# Altium PCB DA13_FPGA_edition.PcbDoc (part 3 of 3)
Units mm, origin at the board's own origin, x right, y up, seen from the top; angles counter-clockwise.
Board outline 118.01 x 92.01 mm, 2 copper layers (Top Layer, Bottom Layer); 473 components, 250 nets, 1417 pads, 16 vias.
Unrouted connection lines stored in the file: 993.
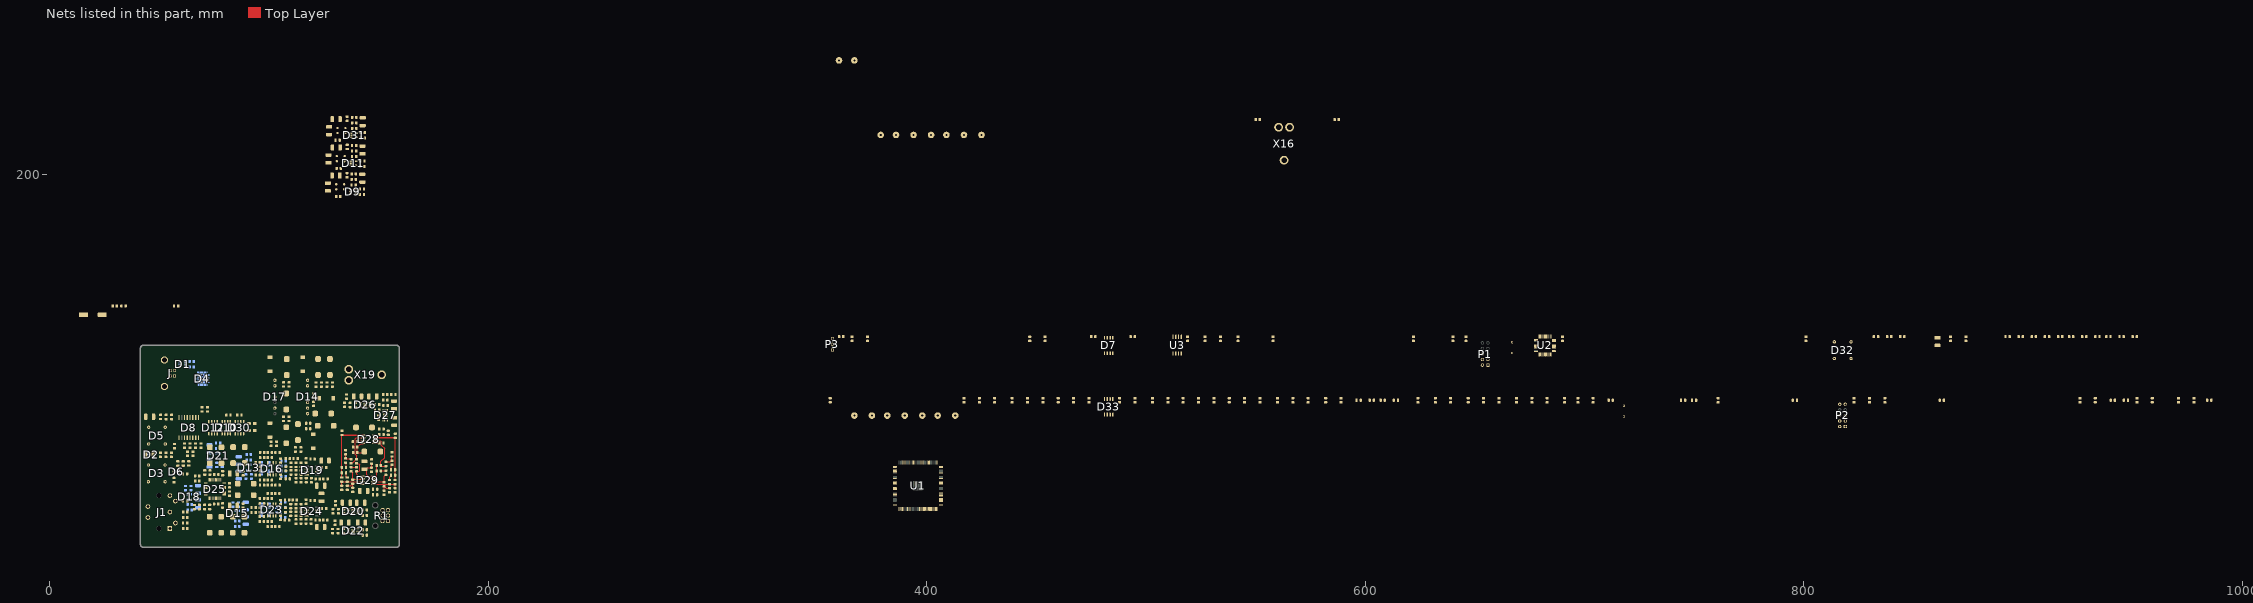
[diagram p2: the nets of this part, all layers, seen from the top]

## Via types
v1: diameter 0.66, hole 0.33, Top Layer to Bottom Layer, tented top, 16 vias

## Nets (pads, with @x,y where several pads share a name; then routed paths per layer and width w, separated by ;. In a path a pad name is that pad's centre, name@x,y a point inside that pad or via, vN(x,y) a via of type N, cw(c..) or ccw(c..) an arc to the next point about the centre after c; other vN are vias at no path point) (continued)
FPGA_nCONFIG: U1.14 U2.42
FPGA_nSTATUS: U1.9 U2.43
FPGA_SPI_CSN: D30.3 U1.76 U2.31
FPGA_SPI_MISO: P2.3 U1.20 U2.16
FPGA_SPI_MOSI: R22.2 R23.1 U2.17
FPGA_SPI_NSS: P2.5 R137.1 U1.18 U2.14
FPGA_SPI_SCK: R86.1 R87.1 U2.15
GND: C2.2 C5.2 C6.2 C7.2 C9.2 C10.2 C11.2 C14.2 C15.2 C29.2 C30.2 C45.2 C46.2 C47.2 C48.2 C49.2 C50.1 C51.2 C52.2 C53.1 C54.2 C55.2 C56.2 C58.2 C61.2 C62.2 C63.1 C64.1 C65.1 C66.1 C67.1 C69.1 C70.2 C73.2 C74.2 C75.2 C76.2 C77.2 C78.2 C80.2 C81.2 C82.2 C83.2 C84.2 C85.1 C90.2 C92.2 C93.2 C94.2 C95.2 C96.2 C97.2 C99.2 C100.2 C101.1 C102.2 C103.1 C104.2 C105.2 C106.2 C107.2 C108.2 C109.2 C110.2 C111.2 C112.2 C114.2 C115.1 C116.1 C117.2 C118.1 C119.1 C120.2 C121.2 C122.2 C124.2 C125.1 C129.1 C132.2 C133.2 C134.1 C135.2 C136.2 C137.1 C138.2 C139.2 C140.1 C141.2 C142.2 C143.1 C144.1 C145.1 C146.2 C147.2 C148.2 C149.1 C150.2 C151.2 C152.2 C153.2 C154.2 C156.2 C157.2 C158.2 C159.2 C160.2 C162.2 C163.1 C164.1 C165.2 C166.2 C170.2 C171.2 C172.1 C173.2 C174.2 C175.2 C176.2 C177.2 C178.1 C182.2 C183.1 C184.2 C185.2 C186.2 D2.3 D3.2 D5.2 D6.3 D8.9 D8.15 D10.5 D12.5 D13.2 D14.6 D15.2 D16.2 D17.4 D18.2 D20.4 D20.9 D21.2 D22.4 D22.9 D23.2 D25.13 D25.17 D25.21 D25.22 D25.29 D25.30 D25.31 D25.32 D25.39 D25.40 D25.45 D25.47 D26.4 D26.9 D27.4 D27.9 D30.5 J1.3 R1.3 R1.4 R11.1 R20.1 R29.2 R53.2 R57.1 R61.1 R81.2 R95.2 R99.1 R102.1 R109.1 R115.1 R121.1 R124.1 R148.1 X5.1 X16.1 X19.1
IN_L: R1.2 R112.1
IN_R: R1.5 R122.1
JTAG_TCK: P2.1 R86.2 R140.2 U1.16
JTAG_TDI: P2.9 R23.2 R138.1 U1.15
MCU_UART_RX: P3.2 U2.13
MCU_UART_TX: P3.1 U2.12
NetC5_1: C5.1 C6.1 C7.1 D3.4 L2.1
NetC8_2: C8.2 D4.48
NetC9_1: C9.1 C10.1 C11.1 D5.4 L3.1
NetC12_1: C12.1 D4.8 X7.1
NetC13_2: C13.2 D4.9 X7.2
NetC14_1: C14.1 C15.1 D6.5 L4.1
NetC28_2: C28.2 D8.1 L5.2
NetC29_1: C29.1 D8.16 L6.1
NetC31_1: C31.1 C32.2 C33.2 L7.2 L8.1 R30.1
NetC33_1: C33.1 D9.5 R28.1 R30.2
NetC36_1: C36.1 C37.2 D9.4 L9.1
NetC38_1: C38.1 C39.2 C40.2 L10.2 L11.1 R32.1
NetC40_1: C40.1 D11.5 R31.1 R32.2
NetC43_1: C43.1 C44.2 D11.4 L12.1
NetC45_1: C45.1 C46.1 C47.1 D14.7 L13.1
NetC50_2: C50.2 C53.2 C72.1 D16.6 R34.2
NetC52_1: C52.1 C54.1 C89.1 D19.7 R33.2
NetC55_1: C55.1 C61.1 D13.1 D13.3 L15.2
NetC57_1: C57.1 C59.1 C60.1 D14.1 L14.2
NetC58_1: C58.1 D13.4
NetC63_2: C63.2 C64.2 C69.2 D14.5 L16.1
NetC68_1: C68.1 R38.2
NetC70_1: C70.1 C236.1 R35.2 R36.1
NetC71_1: C71.1 R42.2
NetC72_2: C72.2 C100.1 C102.1 D16.3 R55.2
NetC73_1: C73.1 C74.1 C75.1 D17.6 L17.1
NetC78_1: C78.1 C82.1 D15.1 D15.3 L18.2
NetC81_1: C81.1 D15.4
NetC85_2: C85.2 C236.2 R50.2 R51.1
NetC86_1: C86.1 C87.1 C88.1 D17.1 L19.2
NetC89_2: C89.2 C101.2 C103.2 D19.4 R56.2
NetC90_1: C90.1 C96.1 D18.1 D18.3 L20.2
NetC91_1: C91.1 R49.2
NetC92_1: C92.1 R47.2
NetC94_1: C94.1 D18.4
NetC95_1: C95.1 R45.2 R46.1 R53.1
NetC98_2: C98.2 D20.2 R54.1 R57.2
NetC107_1: C107.1 D20.6
NetC108_1: C108.1 C111.1 D21.1 D21.3 L21.2
NetC110_1: C110.1 D21.4
NetC113_2: C113.2 D22.2 R58.1 R61.2
NetC115_2: C115.2 C118.2 C127.1 D23.6 R60.2
NetC117_1: C117.1 C120.1 C130.1 D24.7 R59.2
NetC122_1: C122.1 D22.6
NetC123_1: C123.1 R65.2
NetC124_1: C124.1 C237.1 R62.2 R63.1
NetC125_2: C125.2 R66.1 R68.2 R70.1
NetC126_1: C126.1 R69.2
NetC127_2: C127.2 C136.1 C139.1 D23.3 R82.2
NetC129_2: C129.2 C237.2 R78.2 R79.1
NetC130_2: C130.2 C137.2 C140.2 D24.4 R84.2
NetC131_1: C131.1 R76.2
NetC132_1: C132.1 R74.2
NetC133_1: C133.1 R72.2 R73.1 R81.1
NetC134_2: C134.2 C135.1 C138.1 C141.1 C142.1 D25.41 D25.42 R77.1
NetC145_2: C145.2 D25.1
NetC150_1: C150.1 C151.1 C152.1 C153.1 C154.1 D25.19 D25.20 R97.2
NetC155_2: C155.2 D26.2 R98.1 R99.2
NetC160_1: C160.1 D26.6
NetC161_2: C161.2 D27.2 R101.1 R102.2
NetC166_1: C166.1 D27.6
NetC167_1: C167.1 D29.3 R103.1 R115.2 | length 11.3
  Top Layer w0.254: R115.2@133.2,58 133.196,58.004 133.196,59.85 R103.1@133.191,59.854 133.195,59.857 142.657,59.857 D29.3@142.66,59.861
NetC167_2: C167.2 R104.1 | length 2.4
  Top Layer w0.254: R104.1@135.15,63.909 135.15,62.283 135.207,62.226 135.207,62.15 135.62,61.737 C167.2@135.696,61.737
NetC168_1: C168.1 C187.1 R11.2 | length 4.5
  Top Layer w0.254: R11.2@135,72.35 134.991,72.341 C168.1@134.991,70.467 135.148,70.311 137.339,70.311 C187.1@137.496,70.154
NetC168_2: C168.2 R105.1 | length 2.2
  Top Layer w0.254: C168.2@134.991,68.567 135.15,68.408 R105.1@135.15,66.413
NetC169_1: C169.1 D29.2 R113.2 | length 8.7
  Top Layer w0.254: C169.1@137.496,64.546 137.572,64.546 138.209,63.909 R113.2@138.209,60.8 138.374,60.965 142.495,60.965 D29.2@142.66,61.131
NetC169_2: C169.2 R107.1 | length 2.5
  Top Layer w0.254: C169.2@137.496,66.446 R107.1@140,66.446
NetC170_1: C170.1 R112.2 R113.1 | length 4.7
  Top Layer w0.254: C170.1@135.704,58.033 137.192,58.033 138.059,58.9 R113.1@138.209,58.9 R112.2@138.209,57.096
NetC171_1: C171.1 C173.1 D28.8 R106.1
NetC172_2: C172.2 C174.1 D28.4 R110.1 | length 10
  Top Layer w0.5: C172.2@143.5,73.594 143.006,73.1 140.259,73.1 R110.1@140.25,73.091 C174.1@140.25,75.596 140.25,75.753 141.752,77.255 143.026,77.255 D28.4@143.06,77.289 143.425,77.289 D28.4@143.5,77.214
NetC175_1: C175.1 C177.1 D29.8 R111.1 | length 11.5
  Top Layer w0.5: C177.1@143.5,65.6 C177.1@143.961,65.6 ; R111.1@146.8,68.1 C175.1@146.8,66.296 144.877,66.296 144.181,65.6 C177.1@143.961,65.6 ; D29.8@147.54,62.401 145.099,62.401 144.5,63 144.5,65.061 C177.1@143.961,65.6
NetC176_1: C176.1 C178.2 D29.4 R114.1
NetC179_1: C179.1 D29.5 R116.1 R124.2 | length 11.8
  Top Layer w0.254: D29.5@147.54,58.591 147.611,58.662 157.437,58.662 R116.1@157.509,58.733 R124.2@157.509,56.929
NetC179_2: C179.2 R117.1 | length 2.4
  Top Layer w0.254: C179.2@155.004,60.633 155.004,61.919 155.654,62.569 R117.1@155.654,62.787
NetC180_1: C180.1 C188.1 R20.2 | length 4.9
  Top Layer w0.254: C188.1@153.3,68.85 155.276,68.85 155.876,69.45 C180.1@156.1,69.45 R20.2@156.1,71.35
NetC180_2: C180.2 R118.1 | length 2.5
  Top Layer w0.254: R118.1@155.659,65.291 155.659,67.137 156.071,67.55 C180.2@156.1,67.55
NetC181_1: C181.1 D29.6 R123.2 | length 8.8
  Top Layer w0.254: D29.6@147.54,59.861 147.67,59.73 152.37,59.73 R123.2@152.5,59.6 152.5,62.226 153.224,62.95 C181.1@153.3,62.95
NetC181_2: C181.2 R119.1 | length 2.3
  Top Layer w0.254: R119.1@151.054,64.785 151.119,64.85 C181.2@153.3,64.85
NetC182_1: C182.1 R122.2 R123.1 | length 4.7
  Top Layer w0.254: R122.2@152.5,55.8 R123.1@152.5,57.7 152.65,57.7 153.421,56.929 C182.1@155.004,56.929
NetC183_2: C183.2 R39.1 R41.2 R43.1
NetC187_2: C187.2 D28.2 R108.2 | length 16.8
  Top Layer w0.254: C187.2@137.496,68.254 137.834,68.593 138.293,68.593 139.85,70.15 R108.2@140,70.15 140,71.777 139.305,72.472 139.305,79.405 139.729,79.829 D28.2@143.06,79.829
NetC188_2: C188.2 D28.6 R120.2 | length 18
  Top Layer w0.254: D28.6@147.94,78.559 150.841,78.559 151.3,78.1 151.3,76.5 152.7,75.1 152.7,70.8 151.054,69.154 R120.2@151.054,67.289 151.384,66.96 153.29,66.96 C188.2@153.3,66.95
NetC190_1: C190.1 C191.2 C192.2 L22.2 L23.1 R5.1
NetC192_1: C192.1 D31.5 R4.1 R5.2
NetC194_1: C194.1 C195.2 D31.4 L24.1
NetC196_1: C196.1 C197.1 C198.1 D32.4 L25.1 R90.2
NetC200_1: C200.1 U2.5 X17.1
NetC201_2: C201.2 R147.1 X17.2
NetD3_3: D3.3 R9.1
NetD4_1: D4.1 R10.2
NetD4_27: D4.27 R13.2
NetD4_28: D4.28 R14.2
NetD4_29: D4.29 R15.2
NetD4_30: D4.30 R16.2
NetD5_3: D5.3 R12.1
NetD6_4: D6.4 R17.1
NetD7_7: D7.7 R18.2
NetD8_11: D8.11 R24.2
NetD8_12: D8.12 R25.2
NetD8_13: D8.13 R26.2
NetD8_14: D8.14 R27.2
NetD9_3: D9.3 L8.2
NetD11_3: D11.3 L11.2
NetD16_1: D16.1 R49.1 R51.2 R52.1
NetD16_4: D16.4 R48.2
NetD16_5: D16.5 R40.1
NetD16_8: D16.8 R36.2 R37.1 R38.1
NetD19_2: D19.2 R42.1 R43.2
NetD19_3: D19.3 R46.2 R47.1
NetD19_6: D19.6 R44.1
NetD23_1: D23.1 R76.1 R79.2 R80.1
NetD23_4: D23.4 R75.2
NetD23_5: D23.5 R67.1
NetD23_8: D23.8 R63.2 R64.1 R65.1
NetD24_2: D24.2 R69.1 R70.2
NetD24_3: D24.3 R73.2 R74.1
NetD24_6: D24.6 R71.1
NetD25_14: D25.14 R91.2 R95.1
NetD25_46: D25.46 R83.2
NetD28_3: D28.3 R109.2 | length 3.1
  Top Layer w0.254: R109.2@140.2,78.1 140.2,78.145 140.613,78.559 D28.3@143.06,78.559
NetD28_5: D28.5 R121.2 | length 2.5
  Top Layer w0.254: D28.5@147.94,77.289 150.239,77.289 R121.2@150.35,77.4
NetD29_1: D29.1 R107.2 R108.1 | length 10.1
  Top Layer w0.254: R108.1@140,68.25 140.241,68.009 140.891,68.009 141.3,67.6 141.3,64.9 140.946,64.546 R107.2@140,64.546 140,63.2 140.799,62.401 D29.1@142.66,62.401
NetD29_7: D29.7 R119.2 R120.1 | length 7.6
  Top Layer w0.254: D29.7@147.54,61.131 148.831,61.131 149.154,61.454 R119.2@149.154,64.785 R120.1@149.154,67.289
NetD31_3: D31.3 L23.2
NetD32_1: D32.1 R88.2 R90.1
NetD32_3: D32.3 R100.1
NetD33_1: D33.1 R145.2
NetD33_2: D33.2 R143.2
NetD33_5: D33.5 R141.2
NetD33_6: D33.6 R144.2
NetD33_7: D33.7 R142.2
NetJ1_1: J1.1 R85.2
NetJ1_2: J1.2 R89.2
NetJ1_4: J1.4 R93.2
NetJ1_5: J1.5 R94.2
NetJ1_G1: J1.G1 J1.G2 R148.2
NetP1_1: P1.1 U2.7
NetP1_2: P1.2 U2.34
NetP1_6: P1.6 U2.37
NetP2_6: P2.6 R139.1
NetR92_2: R92.2 X16.2
NetR96_2: R96.2 X16.3
NetR125_2: R125.2 R126.1 U2.44
NetR127_2: R127.2 R128.1 U3.3
NetR129_2: R129.2 R130.1 U3.7
NetR147_2: R147.2 U2.6
NetR149_2: R149.2 X19.2
NetR150_2: R150.2 X19.3
OUT_HA_L: D28.1 R103.2 R104.2 R105.2 R149.1 | length 29.2
  Top Layer w0.254: R103.2@133.191,61.754 133.246,61.809 133.246,63.909 133.246,66.413 133.246,81.096 R149.1@133.3,81.15
  Top Layer w0.6: R149.1@133.3,81.15 133.351,81.099 D28.1@143.06,81.099
OUT_HA_R: D28.7 R116.2 R117.2 R118.2 R150.1 | length 28.9
  Top Layer w0.254: R116.2@157.509,60.633 157.554,60.679 157.554,79.804 R150.1@157.589,79.839
  Top Layer w0.5: D28.7@147.94,79.829 D28.7@147.951,79.839 ; R150.1@157.589,79.839 R150.1@157.6,79.85
  Top Layer w0.6: D28.7@147.951,79.839 R150.1@157.589,79.839
USB_5V0: C3.1 C4.1 D11.1 D31.1 L1.2 L9.2 L12.2 L14.1 L19.1 L24.2 X1.1
USB_CONN_DM: D1.1 J.2
USB_CONN_DP: D1.3 J.3
USB_CONN_SHIELD: J.S1 J.S2
USB_DM: D4.4 R8.2
USB_DP: D4.5 R7.2
USB_PROT_DM: D1.6 R8.1
USB_PROT_DP: D1.4 R7.1
USB_VBUS: C1.1 D1.5 J.1 L1.1
VCM_L: C2.1 C185.1 D25.38
VCM_R: C184.1 C186.1 D25.23
pads on no net: D2.1 D4. D4.16 D4.19 D4.20 D4.21 D4.22 D4.36 D4.43 D4.47 D8.7 D8.10 D14.4 D16.7 D17.5 D17.7 D19.1 D19.5 D19.8 D20.3 D20.7 D22.3 D22.7 D23.7 D24.1 D24.5 D24.8 D25.10 D25.11 D25.15 D25.18 D25.24 D25.37 D25.43 D26.3 D26.7 D27.3 D27.7 J1. P1.5 P1.7 P1.8 P1.9 P1.10 P2.7 P2.8 R1.0 U1.7 U1.10 U1.11 U1.25 U1.28 U1.30 U1.31 U1.32 U1.33 U1.39 U1.42 U1.43 U1.44 U1.46 U1.49 U1.50 U1.51 U1.52 U1.53 U1.54 U1.55 U1.83 U1.85 U1.86 U1.87 U1.88 U1.89 U1.90 U1.91 U1.98 U1.99 U1.100 U1.101 U1.103 U1.104 U1.105 U1.106 U1.110 U1.111 U1.112 U1.113 U1.114 U1.115 U1.119 U1.120 U1.121 U1.125 U1.126 U1.127 U1.128 U1.129 U1.132 U1.133 U1.135 U1.136 U1.137 U1.141 U1.142 U1.143 U1.144 U1.145 U2.3 U2.4 U2.10 U2.11 U2.32 U2.33 U2.38
copper on no net:
  other v1: 394.2,56.2 395.4,56.2 396.6,56.2 397.8,56.2 394.2,57.4 395.4,57.4 396.6,57.4 397.8,57.4 394.2,58.6 395.4,58.6 396.6,58.6 397.8,58.6 394.2,59.8 395.4,59.8 396.6,59.8 397.8,59.8

## Keep-outs
Top Layer:
  rectangle: 42,31 159,34
  rectangle: 42,118 159,121

## Silkscreen, mask and mechanical layers (free items; w line width, h text height)
Mechanical 1:
  lines w0.2: 158.301,29.999 42.501,29.999 cw(c42.501,31.104) 41.396,31.104 41.396,120.904 cw(c42.501,120.904) 42.501,122.009 158.301,122.009 ; 352.301,43.999 ccw(c352.301,45.104) 353.406,45.104 353.406,134.904 ccw(c352.301,134.904) 352.301,136.009

## Text inside footprints (layer, text, board x,y; h text height)
P1: Top Overlay "10" at 653.968,124.684 h1.27 r90; Top Overlay "9" at 656.508,124.684 h1.27 r90; Top Overlay "1" at 656.508,110.968 h1.27 r90; Top Overlay "2" at 653.968,110.46 h1.27 r90
P2: Top Overlay "10" at 816.968,96.684 h1.27 r90; Top Overlay "9" at 819.508,96.684 h1.27 r90; Top Overlay "1" at 819.508,82.968 h1.27 r90; Top Overlay "2" at 816.968,82.46 h1.27 r90